# Altium PCB V3.2_Board.PcbDoc (part 8 of 9)
Units mil, origin at the board's own origin, x right, y up, seen from the top; angles counter-clockwise.
Board outline 7795.28 x 4881.89 mil, 2 copper layers (Top Layer, Bottom Layer), stack 57 mil thick; 419 components, 273 nets, 1244 pads, 414 vias.
Unrouted connection lines stored in the file: 3.
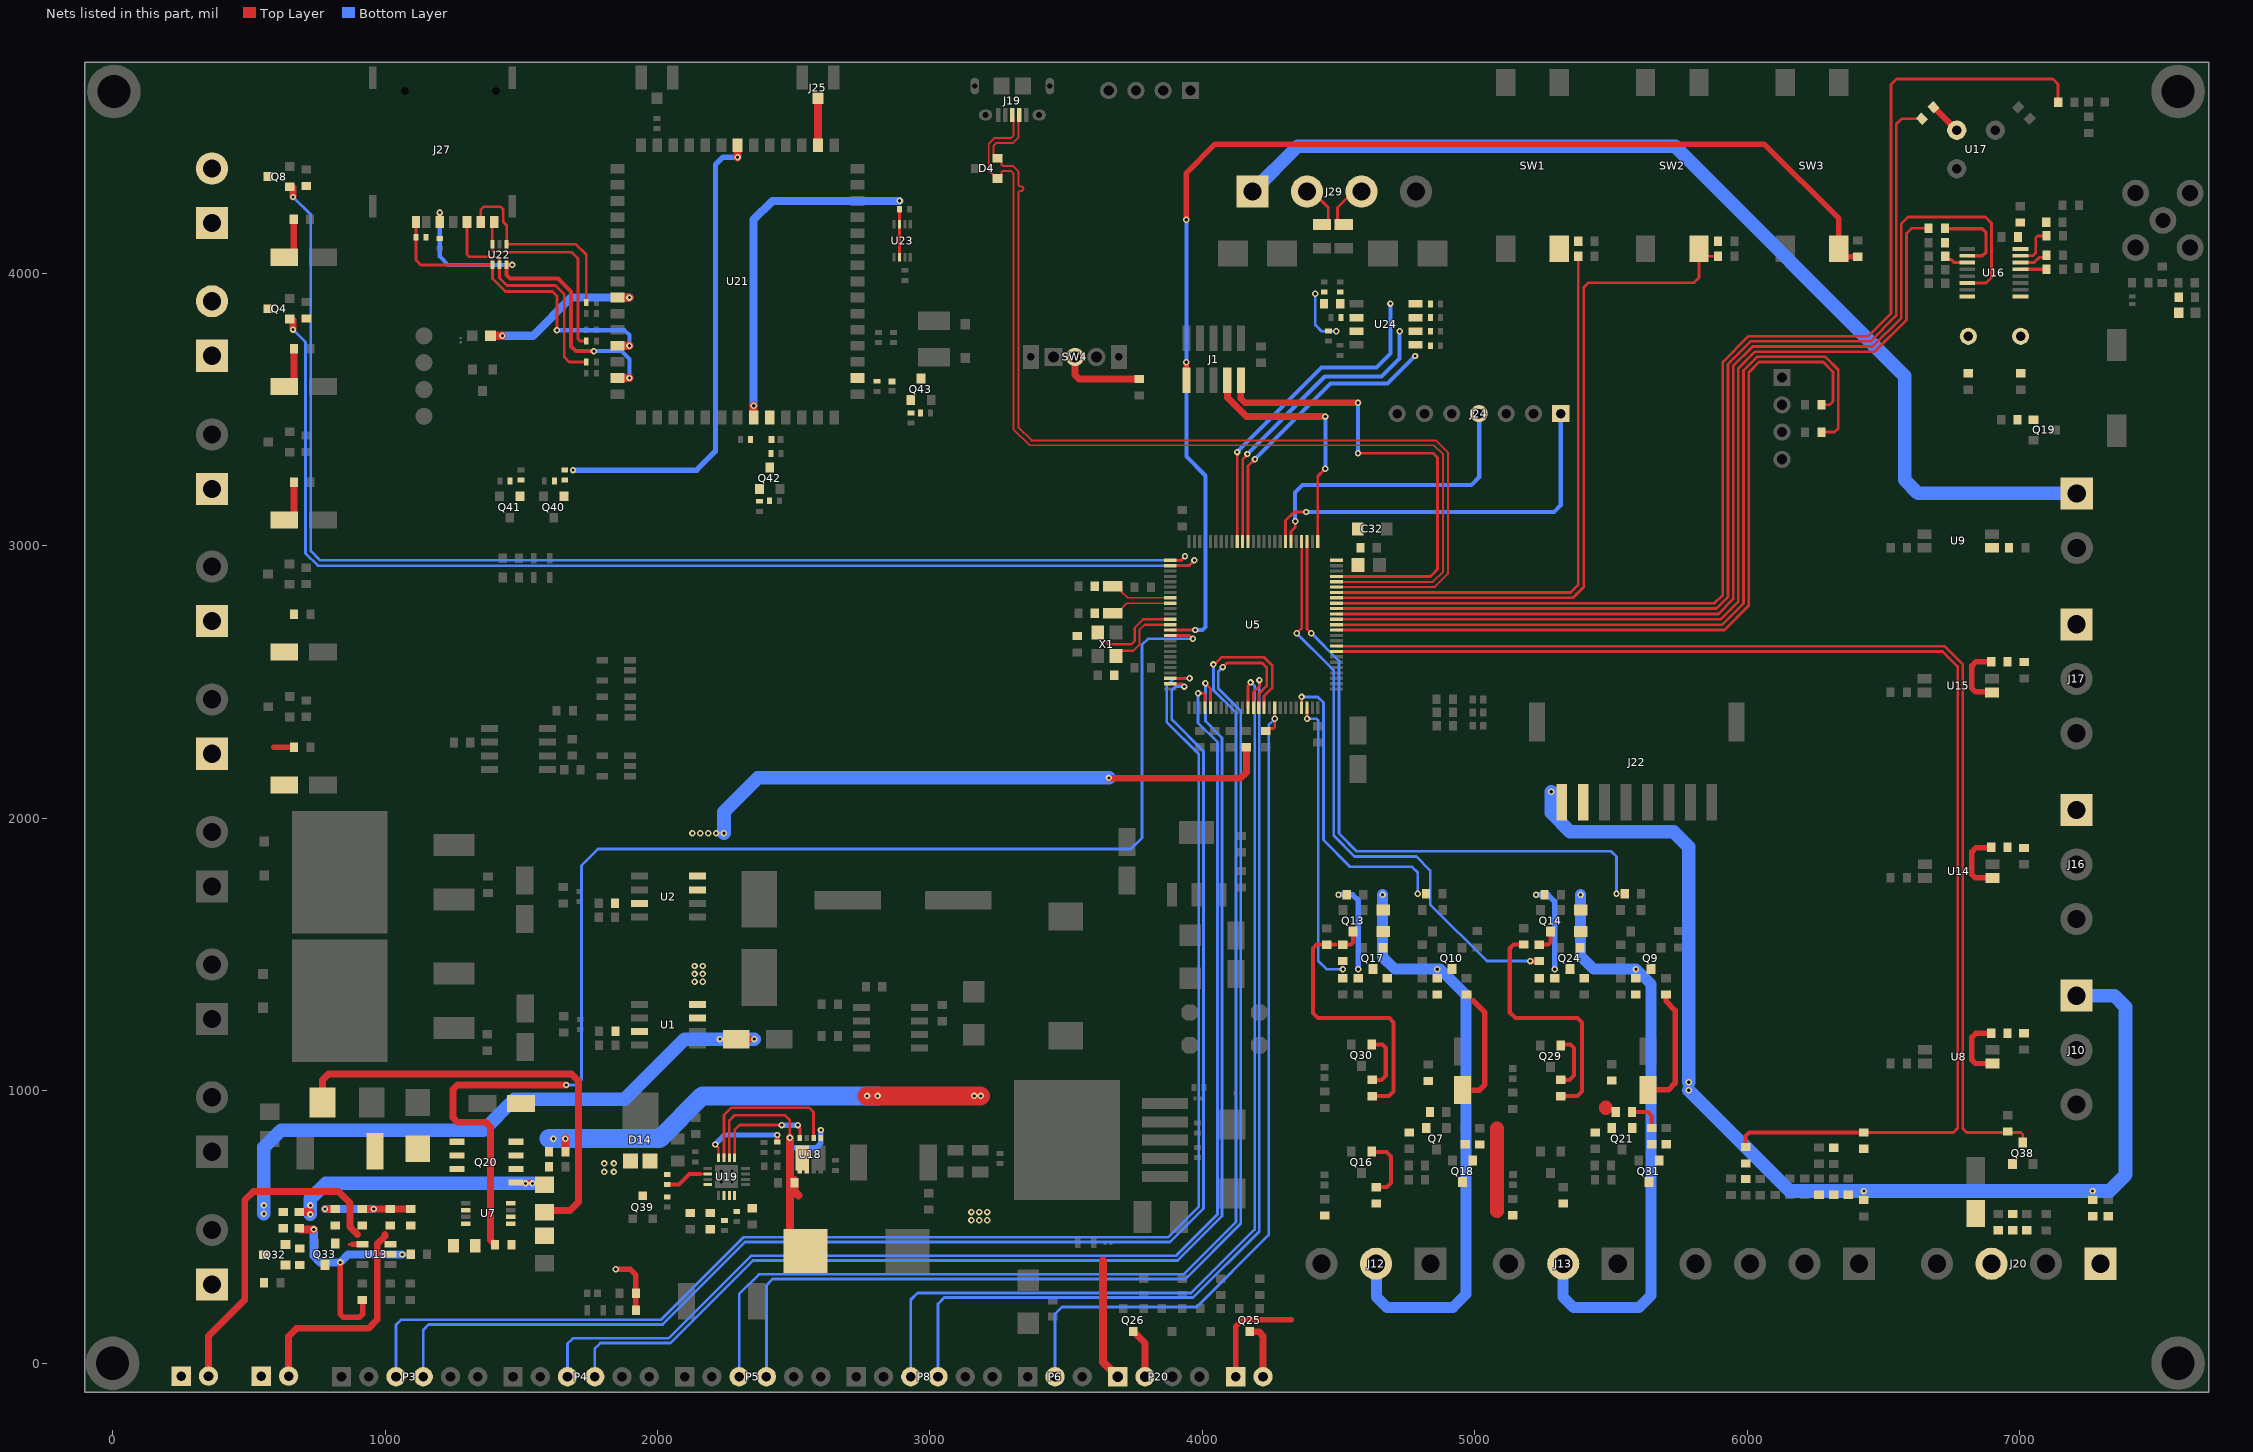
[diagram p4: the nets of this part, all layers, seen from the top]

## Via types
v1: diameter 23.62, hole 11.81, Top Layer to Bottom Layer, 414 vias

## Nets (pads, with @x,y where several pads share a name; then routed paths per layer and width w, separated by ;. In a path a pad name is that pad's centre, name@x,y a point inside that pad or via, vN(x,y) a via of type N, cw(c..) or ccw(c..) an arc to the next point about the centre after c; other vN are vias at no path point) (continued)
NetQ16_1: Q16.1 R90.2 | length 236.9
  Top Layer w15: Q16.1@4621.4,775.59 4675.96,775.59 4692.61,758.94 4692.61,660.9 4677.71,646 R90.2@4638,646
NetQ17_1: Q17.1 R95.1 R97.1
NetQ17_3: Q17.3 R52.2 R86.2 | length 333.1
  Bottom Layer w20: v1(4499.46,1719) 4551,1719 4572,1698 v1(4572,1446.15)
NetQ18_1: Q18.1 R28.2
NetQ18_3: Q18.3 R29.2
NetQ19_1: Q19.1 R62.1
NetQ21_1: Q21.1 R68.1 R107.1 | length 120.8
  Top Layer w15: R68.1@5578.77,922 5635,922 5649,908 R107.1@5649,863.27
NetQ24_1: Q24.1 R96.1 R98.1
NetQ24_3: Q24.3 R56.2 R88.2 | length 327.7
  Bottom Layer w20: v1(5224.2,1719) 5269.13,1719 5293,1695.13 v1(5293,1446.15)
NetQ29_1: Q29.1 R99.2 | length 213.5
  Top Layer w15: Q29.1@5312.4,1169.59 5351.44,1169.59 5364,1157.03 5364,1056 5348,1040 R99.2@5315,1040
NetQ30_1: Q30.1 R100.2 | length 213.5
  Top Layer w15: Q30.1@4621.4,1169.59 4660.44,1169.59 4673,1157.03 4673,1056 4657,1040 R100.2@4624,1040
NetQ31_1: Q31.1 R33.2
NetQ31_3: Q31.3 R107.2
NetQ32_1: Q32.1 Q33.3 R71.2
NetQ33_1: Q33.1 R81.2
NetQ38_1: Q38.1 R22.1
NetQ39_3: Q39.3 R123.1 R125.2 U19.2 | length 165.1
  Top Layer w8: 2157.75,694.7 U19.2@2184.81,694.7
  Top Layer w15: R123.1@2036,655.5 2079,655.5 2118.2,694.7 2157.75,694.7
NetQ40_1: Q40.1 R138.2 R139.2
NetQ41_1: Q41.1 R141.2 R142.2
NetQ42_1: Q42.1 R143.1 R145.2
NetQ43_1: Q43.1 R146.1 R147.2
NetR5_1: R5.1 U1.7
NetR8_1: R8.1 U2.7
NetR16_1: R16.1 SW4.2 | length 309.2
  Top Layer w25: SW4.2@3532.26,3693 3532.26,3626.64 3546.9,3612 R16.1@3769,3612
NetR37_1: R37.1 U14.1 | length 240.8
  Top Layer w20: R37.1@6894.97,1891.79 6839,1891.79 6824,1876.79 6824,1794 6837.11,1780.89 U14.1@6899.38,1780.89
NetR39_1: R39.1 U15.1 | length 240.8
  Top Layer w20: R39.1@6895.18,2574.45 6839.21,2574.45 6824.21,2559.45 6824.21,2476.67 6837.32,2463.56 U15.1@6899.59,2463.56
NetR61_1: R61.1 R63.1 R108.1 U24.7 | length 200.5
  Bottom Layer w10: v1(4414.31,3925) 4414.31,3810.69 4437.52,3787.48 v1(4490.9,3787.48)
NetR78_1: R78.1 U8.1 | length 240.8
  Top Layer w20: R78.1@6894.97,1210.79 6839,1210.79 6824,1195.79 6824,1113 6837.11,1099.89 U8.1@6899.38,1099.89
NetR80_1: R80.1 U9.1
NetR87_1: R87.1 R106.2 R108.2 U24.6
NetR111_1: R111.1 SB37.1
NetR112_2: R112.2 R113.2 R114.2
NetR115_1: R115.1 SB38.1
NetR116_1: R116.1 U17.2 | length 120.4
  Top Layer w22: R116.1@6683.19,4609.59 6683.82,4609.59 6768.05,4525.36 U17.2@6768.69,4525.36
NetR121_1: R121.1 U19.16 | length 322.8
  Top Layer w7: R121.1@2439.57,811.45 R121.1@2439.88,811.14
  Top Layer w8: v1(2211.65,802.64) 2211.65,802.55 2224.06,790.14 U19.16@2224.06,753.89
  Top Layer w15: R121.1@2439.57,811.45 v1(2439.57,837.51)
  Bottom Layer w20: v1(2211.65,802.64) 2246.52,837.51 v1(2439.57,837.51)
NetR122_1: R122.1 R124.1 U19.4
NetR127_1: R127.1 R129.2 U19.8
NetSB7_1: SB7.1 U7.5 | length 3.2
  Top Layer w10: SB7.1@1461.88,437.59 SB7.1@1464.11,435.36
NetSB17_2: SB17.2 U16.5 | length 95.8
  Top Layer w12: U16.5@7002.44,4014.5 U16.5@7002.44,4014.5 7098.15,4014.56 SB17.2@7098.21,4014.61
NetSB18_1: SB18.1 U16.10 | length 302.8
  Top Layer w12: SB18.1@6725,4164 6861.68,4164 6876,4149.68 6876,4077.67 6862.83,4064.5 U16.10@6807.56,4064.5
NetU18_2: U18.2 U19.15 | length 598.7
  Top Layer w10: U19.15@2243.93,753.69 2244.11,753.87 2244.11,910.61 2271.5,938 2556.19,938 2572.88,921.31 U18.2@2572.88,826.64
NetU18_4: U18.4 U19.13 | length 391.7
  Top Layer w10: U19.13@2283.3,753.69 2283.3,855.73 2301.57,874 v1(2456,874) ; v1(2514.82,874) 2514.82,870.31 2522.7,862.44 U18.4@2522.7,826.64
  Bottom Layer w20: v1(2456,874) v1(2514.82,874)
NRST: C73.2 J1.10 SW3.3 U5.14 | length 4639.2
  Top Layer w10: U5.14@3881.86,2690.84 3881.94,2690.92 3973.74,2690.92 v1(3973.88,2691.05) ; SW3.3@6335.54,4090.4 SW3.3@6364.94,4061
  Top Layer w20: J1.10@3941,3608 v1(3941,3674) ; v1(3941,4197) 3941,4368 4047,4474 6061.92,4474 6335.54,4200.38 SW3.3@6335.54,4090.4 ; SW3.3@6364.94,4061 C73.2@6405,4061
  Bottom Layer w15: v1(3941,4197) v1(3941,3674) 3941,3328 4012,3257 4012,2702.72 4000.28,2691 v1(3973.88,2691.05)
  Bottom Layer w20: v1(3973.88,2691.05) v1(3973.88,2691.05)
OSC_IN: C53.2 U5.8 X3.1 | length 255.5
  Top Layer w7: X3.1@3648.22,2851.06 X3.1@3671,2851.06 X3.1@3686.75,2851.06 ; X3.1@3683.97,2851.06 X3.1@3686.75,2851.06 ; U5.8@3881.86,2808.95 3881.55,2809.26 3725.78,2809.26 3702.93,2832.1 3702.93,2834.88 X3.1@3686.75,2851.06
OSC_OUT: C78.2 U5.9 X3.2 | length 245.2
  Top Layer w7: X3.2@3648.22,2752.64 X3.2@3671,2752.64 X3.2@3686.75,2752.64 ; X3.2@3686.56,2752.64 X3.2@3686.75,2752.64 ; U5.9@3877.98,2789.26 3723.19,2789.26 3702.93,2769.01 3702.93,2768.82 X3.2@3686.75,2752.64
OV_UV_EN: R81.1 R82.2 R117.1 R118.1 | length 394.9
  Top Layer w25: v1(779.77,565.93) R81.1@818.18,565.93 ; R117.1@916.95,565.93 v1(959,565.93) R118.1@1019.31,565.93 R82.2@1094.27,565.93
  Bottom Layer w30: v1(779.77,565.93) v1(959,565.93)
PATCH: C77.1 L4.1
PH: C82.2 L5.1 U18.1 U18.5 U19.14 | length 1067.2
  Top Layer w10: U19.14@2263.62,753.69 2263.62,891.41 2281.79,909.59 2468.04,909.59 2485.96,891.67 v1(2485.96,827.27)
  Top Layer w30: L5.1@2485.96,462 v1(2485.96,827.27) ; C82.2@2502.88,672.32 C82.2@2502.88,662.64 2502.88,630.63 2518.08,615.42
  Bottom Layer w20: v1@2485.91,827.22 2485.91,801.53 2497.44,790 2581.32,790 2599.69,808.37 v1(2599.69,855.83)
PIR_OUT: R116.2 U5.66 | length 3805.8
  Top Layer w10: U5.66@4492.1,2769.58 5886.63,2769.58 5929,2811.95 5929,3667.42 6011.99,3750.41 6451.85,3750.41 6546.11,3844.68 6546.11,4547.11 6566.16,4567.16 R116.2@6640.76,4567.16
PM_CNTRL: Q4.1 R6.1 U5.2 | length 4261.8
  Top Layer w10: U5.2@3881.86,2927.06 3950.5,2927.06 v1(3970.44,2947)
  Top Layer w25: v1(662.32,3793.61) Q4.1@662.32,3829.13
  Bottom Layer w10: v1@662.32,3793.31 707.98,3747.65 707.98,2972.36 753.34,2927 3950.44,2927 v1(3970.44,2947)
PROP_MIXING: J8.2 Q4.3
PS_MCU: SB37.2 SB38.2 U5.58 | length 4828
  Top Layer w10: U5.58@4492.1,2612.09 6716.69,2612.09 6772,2556.79 6772,862.43 6756.57,847 SB38.2@6428,847
  Top Layer w15: SB37.2@5993.87,793 5993.87,833.93 6006.94,847 SB38.2@6428,847
PS_PWR: J20.1 SB43.2 SB44.2
PSW_MCU: C40.1 D12.1 J20.3 R22.2 R66.2
PWM_D2: Q38.3 R20.1 U5.59 | length 4279.5
  Top Layer w10: U5.59@4501,2631.78 6723.88,2631.78 6791,2564.66 6791,860.54 6804.54,847 7003,847 7011,839 Q38.3@7011,810.37
PWRKEY: C102.2 D19.1 Q43.3 U21.30
R_GND: P20.2 Q26.3 | length 183.2
  Top Layer w25: Q26.3@3746.83,116.21 3789.25,73.79 P20.2@3789.25,-49.47
RE/DE/RS485/T: R58.1 R59.1 U5.90 U24.2 U24.3 | length 1132
  Top Layer w10: U5.90@4147.61,3015.64 4147.61,3316.47 4165,3333.87 v1(4165,3337)
  Bottom Layer w15: v1(4165,3337) 4449,3621 4657,3621 4724,3688 v1(4724,3787)
RESIN_SAVER: J9.2 Q8.3
RF_ANT: J25.1 U21.45 | length 173.5
  Top Layer w30: U21.45@2589.2,4470.13 2589.2,4638.1 J25.1@2593.11,4642.01
RF_DO: SB18.2 U5.64 | length 3454.5
  Top Layer w10: U5.64@4492.1,2730.21 5901,2730.21 5967,2796.21 5967,3651.68 6027.73,3712.41 6467.59,3712.41 6584.11,3828.94 6584.11,4146.78 6602.33,4165 SB18.2@6665,4165
RF_RSSI: U5.65 U16.14 | length 4016
  Top Layer w10: U5.65@4492.1,2749.89 5893.81,2749.89 5948,2804.08 5948,3659.55 6019.86,3731.41 6459.72,3731.41 6565.11,3836.81 6565.11,4182.11 6589.32,4206.32 6873.55,4206.32 6896,4183.87 6896,3984.36 6876.14,3964.5 U16.14@6807.56,3964.5
RO1: C71.2 U16.1 X2.1 | length 0.9
  Top Layer w12: U16.1@7002.44,3914.5 U16.1@7003.06,3913.88
RO2: C72.2 U16.16 X2.2 | length 3.7
  Top Layer w12: U16.16@6807.56,3914.5 6810.05,3914.5 U16.16@6810.94,3913.61
RS485/RS232/T.RXD/RS485/RS232/T: R57.1 U5.89 U24.1 | length 1057.4
  Top Layer w10: U5.89@4167.29,3015.64 4167.29,3292.47 v1(4192.54,3317.72)
  Bottom Layer w15: v1(4192.54,3317.72) 4469.83,3595 4679,3595 v1(4780.5,3696.5)
RS485/RS232/T.TXD/RS485/RS232/T: R60.1 U5.91 U24.4 | length 1224.4
  Top Layer w10: v1(4127.31,3343.73) 4127.46,3343.58 4127.46,3016.1 U5.91@4127.92,3015.64
  Bottom Layer w15: v1(4127.31,3343.73) 4127.31,3344.04 4437.27,3654 4638.21,3654 4690,3705.79 v1(4690,3889)
RS485_N: F2.2 J29.2 | length 178.7
  Top Layer w10: J29.2@4384,4300 4402.81,4300 4461.86,4240.94 4461.86,4240.21 4461.86,4193.5 4447.18,4178.82 F2.2@4439.06,4178.82
RS485_P: F3.2 J29.3 | length 188.9
  Top Layer w10: F3.2@4518.67,4178.82 4510.55,4178.82 4495.86,4193.5 4495.86,4226.13 4495.86,4240.94 4554.92,4300 J29.3@4584,4300
RS_CNTRL: Q8.1 R9.1 U5.1 | length 4652.2
  Top Layer w10: U5.1@3881.86,2946.74 3923.33,2946.74 3936,2959.41 v1(3936,2962)
  Top Layer w25: v1(662.32,4280.07) Q8.1@662.32,4315.59
  Bottom Layer w10: v1@662.52,4280.07 727.73,4214.87 727.73,2981.3 762.3,2946.73 3920.73,2946.73 v1(3936,2962)
RST_GSM: C100.2 D16.1 Q42.3 U21.24
RX_D1: SB19.1 U5.62 | length 2902.2
  Top Layer w10: U5.62@4492.1,2690.84 5915.37,2690.84 6005,2780.47 6005,3635.94 6043.47,3674.41 6278.51,3674.41 6314.63,3638.29 6314.63,3529.86 6302.14,3517.36 SB19.1@6272.11,3517.36
RX_D2: SB20.1 U5.63 | length 3051.8
  Top Layer w10: U5.63@4492.1,2710.52 5908.18,2710.52 5986,2788.34 5986,3643.81 6035.6,3693.41 6286.38,3693.41 6333.63,3646.16 6333.63,3430.8 6320.19,3417.36 SB20.1@6272.11,3417.36
RXIN1: R91.2 R101.1 U5.48 | length 1070
  Top Layer w10: U5.48@4383.83,2405.4 4383.91,2405.32 4383.91,2365.09 v1(4384,2365)
  Bottom Layer w10: v1(4384,2365) 4419.14,2365 4425,2359.14 4425,1476 4454.85,1446.15 v1(4515.6,1446.15)
RXIN1#: Q13.3 R48.1 R100.1 R101.2 | length 1061.7
  Top Layer w15: R48.1@4450.53,1536.28 4488,1536.28 ; R48.1@4457,1536 4419.53,1536 4406,1522.47 4406,1285.11 4424.11,1267 4686,1267 4702,1251 4702,997 4685,980 R100.1@4624,980 ; R101.2@4515.6,1536 4545,1536 4553,1544 Q13.3@4553,1584.39
RXIN2: R92.2 R102.1 U5.79 | length 2161.1
  Top Layer w10: v1(4346,2679) 4364.14,2697.14 U5.79@4364.14,3015.64
  Top Layer w20: v1(5203.35,1476) R102.1@5236,1476
  Bottom Layer w10: v1(4346,2679) 4461,2564 4482,2543 4482,1936.26 4558.41,1859.85 4785.12,1859.85 4836,1808.97 4836,1684 5044,1476 v1(5203.35,1476)
RXIN2#: Q14.3 R49.1 R99.1 R102.2 | length 992
  Top Layer w15: R49.1@5179,1536.28 5141.53,1536.28 5128,1522.75 5128,1287.78 5148.78,1267 5377,1267 5393,1251 5393,997 5376,980 R99.1@5315,980 ; R102.2@5240.34,1536 5269.74,1536 5277.74,1544 Q14.3@5277.74,1584.39
S_VIN: D14.1 D14.2 J21.1 R123.2 R126.2 R128.2 | length 212.6
  Top Layer w20: v1(1847,345) 1847.21,345.21 1899.36,345.21 1921,323.57 R128.2@1921,257 R126.2@1921,194
  other v1: 1805,702.08 1840,702.08 1805,733.08 1840,733.08
SCK_NFC: J24.1 U5.82 | length 1446
  Top Layer w10: U5.82@4305.09,3015.64 4305.09,3092.09 4337,3124 v1(4381,3124)
  Bottom Layer w15: v1(4381,3124) 5290.15,3124 5315,3148.85 J24.1@5315,3485
SEL0: R104.1 SB42.1 U16.7 | length 158.9
  Top Layer w10: U16.7@7002.44,4064.5 7048.73,4064.5 7058.15,4073.91 7058.15,4130.19 7065.18,4137.22 SB42.1@7098.21,4137.22
SEL1: R55.1 SB41.1 U16.11 | length 100.2
  Top Layer w12: R55.1@6726,4051.98 6735,4051.98 6726,4060.98 R55.1@6726,4062 ; R55.1@6735,4050.98 6735,4050.79 6748.75,4050.79 6760.05,4039.5 U16.11@6807.56,4039.5
SHDN: R64.2 SB7.2 U5.15 | length 5060.7
  Top Layer w10: U5.15@3881.86,2671.15 3952.45,2671.15 3965.01,2658.59 v1(3965.12,2658.59)
  Top Layer w25: SB7.2@1404.11,435.36 1403,435.36 1387,451.36 1387,867 1370,884 1265.99,884 1249,900.99 1249,1004 1266,1021 v1(1665,1021)
  Bottom Layer w10: v1(1665,1021) 1702,1021 1721,1040 1721,1827.04 1780.96,1887 3737.06,1887 3778.26,1928.21 3778.26,2637.13 3799.73,2658.59 v1(3965.12,2658.59)
SHDN#: C75.1 R105.2 U16.8
SIM_CD: J27.CD R144.2 U21.12 U22.4 | length 1219.3
  Top Layer w10: J27.CD@1113.66,4182.87 1113.66,4048.34 1131.19,4030.81 U22.4@1394.41,4030.81 1394.41,3980.31 1441.64,3933.07 1614.14,3933.07 1631,3916.21 v1(1631,3791) ; U21.12@1852.98,3733.91 U21.12@1854.07,3735
  Top Layer w30: U21.12@1852.98,3733.91 v1(1896.86,3733.91)
  Bottom Layer w15: v1(1631,3791) 1879,3791 1896.86,3773.14 v1(1896.86,3733.91)
SIM_CLK: J27.C3 R135.1 U22.3 | length 758.1
  Top Layer w7: U22.3@1394.41,4107.19 1394.35,4107.13 1394.35,4082.3 1399.09,4077.56 1459.08,4077.56
  Top Layer w10: J27.C3@1393.19,4174.99 1393.19,4108.41 U22.3@1394.41,4107.19 ; J27.C3@1393.19,4179.99 J27.C3@1401.06,4187.87 ; 1459.08,4077.56 1684.44,4077.56 1708,4054 1708,3759.57 1715.94,3751.63 R135.1@1738.61,3751.63
SIM_DATA: J27.C7 R134.1 U22.1 | length 748.2
  Top Layer w10: J27.C7@1351.06,4187.87 1351.06,4231.64 1364,4244.57 1423.43,4244.57 1434,4234 1434,4188.26 1446.81,4175.45 ; 1446.81,4170.45 1446.81,4108.41 U22.1@1445.59,4107.19 1699.81,4107.19 1738.61,4068.39 R134.1@1738.61,3893.36
SIM_RST: J27.C2 R136.1 U22.5 | length 892.2
  Top Layer w7: 1377.14,4060.56 1415.31,4060.56 1420,4055.87 U22.5@1420,4030.81
  Top Layer w10: J27.C2@1301.06,4182.87 1301.06,4069 1309.5,4060.56 1377.14,4060.56 ; U22.5@1420,4030.81 1420,3983 1448,3955 1625.72,3955 1658,3922.72 1658,3692.58 1675.72,3674.86 R136.1@1738.61,3674.86
SIM_VDD: C101.1 J27.C1 R144.1 U21.14 U22.6 | length 1343.2
  Top Layer w10: J27.C1@1201,4187.93 J27.C1@1201.06,4187.87
  Top Layer w15: U22.6@1445.59,4025.06 1445.59,3993.79 1459.08,3980.31 1635.76,3980.31 1683,3933.07 1683,3732 1700.8,3714.2 v1(1766.61,3714.2) ; U22.6@1445.59,4030.81 v1(1466.81,4030.81)
  Top Layer w20: J27.C1@1201,4187.93 v1(1201,4223) ; U21.14@1852.98,3615.8 U21.14@1853.09,3615.91
  Top Layer w30: U21.14@1853.09,3615.91 v1(1896.97,3615.91)
  Bottom Layer w15: v1@1201,4228 1201,4061 1231.19,4030.81 v1(1466.81,4030.81) ; v1(1766.61,3714.2) 1867.8,3714.2 1896.97,3685.03 v1(1896.97,3615.91)
SNS_IN: SB3.2 U5.67 | length 4512.8
  Top Layer w10: U5.67@4492.1,2789.26 5879.44,2789.26 5910,2819.82 5910,3675.29 6004.12,3769.41 6443.98,3769.41 6527.11,3852.55 6527.11,4693.12 6546.99,4713 7122,4713 7140,4695 7140,4635 SB3.2@7145,4630
SPI_NFC.SS_NFC: J24.4 U5.81 | length 1119.8
  Top Layer w10: U5.81@4324.77,3015.64 4324.77,3052.77 4340.96,3068.96 v1(4340.96,3090.04)
  Bottom Layer w15: v1(4340.96,3090.04) 4339.72,3091.28 4339.72,3194.95 4367.56,3222.79 4986.73,3222.79 5016,3252.06 5016,3484 J24.4@5015,3485
SQ: SB6.1 U16.6 | length 106.6
  Top Layer w10: U16.6@7002.44,4039.5 7052.7,4039.5 7072.14,4058.94 7091.53,4058.94 SB6.1@7098.21,4065.61
STATUS: R138.1 U21.50 | length 1739.4
  Top Layer w30: v1(2293.92,4426.25) U21.50@2293.92,4470.13
  Bottom Layer w20: v1(1690,3277.86) 2143.41,3277.86 2213,3347.45 2213,4398.83 2240.42,4426.25 v1(2293.92,4426.25)
SW_1: C37.2 R18.1 SW1.3 U5.69 | length 2104.6
  Top Layer w10: U5.69@4492.1,2828.63 5351.63,2828.63 5379.05,2856.05 C37.2@5379.05,4062.36
SW_2: C38.2 R19.1 SW2.3 U5.68 | length 2700.3
  Top Layer w10: U5.68@4492.1,2808.95 5359.37,2808.95 ; 5359.37,2809.26 5360.54,2809.26 5399.05,2847.77 5399.05,3947.05 5417.67,3965.67 5804.72,3965.67 5822.76,3983.7 SW2.3@5822.76,4062.36 ; SW2.3@5822.76,4090.4 SW2.3@5822.76,4065.79 ; C38.2@5892.41,4062.36 SW2.3@5847.36,4062.36 ; SW2.3@5822.76,4062.36 SW2.3@5847.36,4062.36 ; SW2.3@5822.76,4062.36 SW2.3@5822.76,4065.79 ; SW2.3@5822.76,4065.79 5847.36,4090.4 SW2.3@5847.36,4062.36
SWCLK: J1.4 U5.76 | length 921.2
  Top Layer w10: U5.76@4423.2,3015.64 4423.2,3255.2 v1@4450.54,3282.54
  Top Layer w25: J1.4@4091,3608 4091.81,3607.19 4091.81,3543.58 4161.22,3474.17 v1(4450.54,3474.17)
  Bottom Layer w15: v1(4451,3283) v1@4451,3473.71
SWDIO: J1.2 U5.72 | length 1779.3
  Top Layer w10: U5.72@4492.1,2887.69 4836.69,2887.69 4863,2914 4863,3323 4846,3340 v1(4571,3340)
  Top Layer w25: J1.2@4141,3608 4141,3539.64 4155.64,3525 v1(4571,3525)
  Bottom Layer w15: v1(4571,3340) v1(4571,3525)
TDS_1: P3.4 U5.24 | length 5276.6
  Top Layer w10: U5.24@3881.86,2493.98 3922.33,2493.98 v1(3933.02,2483.3)
  Bottom Layer w10: P3.4@1140.25,-49.47 1140.25,122.25 1160.31,142.31 2019.11,142.31 2321.79,445 3881.12,445 4004,567.88 4004,2245.84 3887.94,2361.91 3887.94,2470.39 3900.85,2483.3 v1(3933.02,2483.3)
TDS_2: P3.3 U5.23 | length 5444.1
  Top Layer w10: U5.23@3881.86,2513.67 3881.94,2513.74 3952.41,2513.74 v1(3952.75,2514.08)
  Bottom Layer w10: P3.3@1040.25,-49.47 1040.25,141.25 1058.31,159.31 2012.06,159.31 2314.75,462 3874.08,462 3987,574.92 3987,2235.01 3868.64,2353.37 3868.64,2486.25 3896.06,2513.67 3952.34,2513.67 v1(3952.75,2514.08)
TDS_3: P4.4 U5.30 | length 4684.9
  Top Layer w10: v1(4010.94,2495.2) 4029.5,2476.64 U5.30@4029.5,2405.4
  Bottom Layer w10: P4.4@1770,-49.47 1770,54 1790.31,74.31 2047.27,74.31 2349.96,377 3909.29,377 4072,539.71 4072,2295.14 4010.94,2356.2 v1(4010.94,2495.2)
TDS_4: P4.3 U5.29 | length 4720.6
  Top Layer w10: v1(3984.13,2459) 4003.96,2459 4009.81,2453.14 U5.29@4009.81,2405.4
  Bottom Layer w10: P4.3@1670,-49.47 1670,72 1689.31,91.31 2040.23,91.31 2342.92,394 3902.25,394 4055,546.75 4055,2279.37 3984.13,2350.24 v1(3984.13,2459)
TDS_5: P5.4 U5.39 | length 4588.1
  Top Layer w10: v1(4074.62,2554.85) 4089.59,2569.82 4219.52,2569.82 4235.97,2553.36 4235.97,2484.89 4206.66,2455.58 U5.39@4206.66,2405.4
  Bottom Layer w10: P5.4@2399.75,-49.47 2399.75,286.23 2422.52,309 3937.46,309 4140.35,511.9 4140.35,2394.69 4058.06,2476.98 4058.06,2538.29 v1(4074.62,2554.85)
TDS_6: P5.3 U5.40 | length 4723
  Top Layer w10: v1(4040.54,2564.46) 4043.46,2564.46 4069.59,2590.59 4226.9,2590.59 4255.81,2561.68 4255.81,2477.86 4226.35,2448.4 U5.40@4226.35,2405.4
  Bottom Layer w10: P5.3@2299.75,-49.47 2299.75,253.75 2372,326 3930.42,326 4123.35,518.94 4123.35,2387.65 4041.06,2469.94 4041.06,2563.94 v1(4040.54,2564.46)
TDS_7: P8.4 U5.38 | length 3691.9
  Top Layer w10: U5.38@4186.98,2405.4 4186.98,2462.77 4210.19,2485.98 4210.19,2506.13 v1(4209.16,2507.16)
  Bottom Layer w10: P8.4@3029.5,-49.47 3029.5,217.98 3052.52,241 3965.62,241 4209,484.38 4209,2507 v1(4209.16,2507.16)
TDS_8: P8.3 U5.37 | length 3763.1
  Top Layer w10: U5.37@4167.29,2405.4 4167.29,2485.89 4176.66,2495.26 v1(4176.66,2498.56)
  Bottom Layer w10: P8.3@2929.5,-49.47 2929.5,232.94 2954.56,258 3958.58,258 4191.65,491.07 4191.65,2485.12 4178.21,2498.56 v1(4176.66,2498.56)
TDS_IN.TEMP_SNS: P6.2 R31.1 U5.42 | length 3150.3
  Top Layer w10: R31.1@4234.75,2320.85 R31.1@4232.25,2320.85 4240.97,2329.56 4259.81,2329.56 4265.72,2335.47 U5.42@4265.72,2405.4
  Bottom Layer w10: P6.2@3459.25,-49.47 3459.25,181.19 3484.67,206.61 3979.32,206.61 4243,470.29 4243,2342.37 v1(4265.72,2365.09)
TXIN1: R47.2 U5.47 | length 1106.7
  Top Layer w7: v1(4364,2445.46) v1@4364.07,2445.39 ; U5.47@4364.07,2405.47 U5.47@4364.14,2405.4
  Top Layer w10: U5.47@4364.07,2405.47 v1@4364.07,2445.39
  Bottom Layer w10: v1(4364,2445.46) 4423.36,2445.46 4444,2424.82 4444,1920.52 4542.67,1821.85 4769.38,1821.85 4790.19,1801.04 v1(4790.19,1723)
TXIN2: R46.2 U5.78 | length 2310.1
  Top Layer w10: U5.78@4383.83,3015.64 4383.83,2694.76 v1(4399.59,2679)
  Bottom Layer w10: v1(4399.59,2679) 4501,2577.59 4501,1944.13 4566.28,1878.85 5499.99,1878.85 5519.83,1859.02 v1(5519.83,1723)
USB_D_N: D4.2 J19.2 U5.70 | length 3794.2
  Top Layer w7: J19.2@3328.11,4581.04 3324.32,4577.24 3324.32,4498.07 3304.24,4478 3243.07,4478 3233.78,4468.71 3233.78,4435.24 3246.42,4422.6 3250.35,4422.6 3263,4409.96 3263,4398.3 3267.1,4394.2 3303.97,4394.2 3324.32,4373.86 3324.32,4331.14 3324.32,4327.64 ccw(c3332.82,4327.64) 3332.82,4319.14 3334.28,4319.14 cw(c3334.28,4310.64) 3334.28,4302.14 3332.82,4302.14 ccw(c3332.82,4293.64) 3324.32,4293.64 3324.32,4272.15 3324.32,3435.86 3373.13,3387.04 4857.25,3387.04 4901,3343.28 4901,2897 4853.16,2849.16 4492.94,2849.16 U5.70@4492.1,2848.32
USB_D_P: D4.1 J19.3 U5.71 | length 3794.5
  Top Layer w7: J19.3@3302.52,4581.04 3306.32,4577.24 3306.32,4505.53 3296.79,4496 3235.61,4496 3215.78,4476.16 3215.78,4378.44 3246.42,4347.8 3250.35,4347.8 3263,4360.44 3263,4372.1 3267.1,4376.2 3296.52,4376.2 3306.32,4366.4 3306.32,4288.94 3306.32,4198 3306.32,3428.4 3365.68,3369.04 4849.79,3369.04 4883,3335.83 4883,2904.46 4845.7,2867.16 4492.94,2867.16 U5.71@4492.1,2868
USB_VBUS: F1.1 U21.9 | length 611.7
  Top Layer w30: F1.1@1387.19,3770.58 v1(1431.07,3770.58) ; U21.9@1852.98,3911.08 v1(1896.86,3911.08)
  Bottom Layer w30: v1(1431.07,3770.58) 1542.62,3770.58 1683.12,3911.08 v1(1896.86,3911.08)
VCC: C24.1 C25.1 C43.1 C45.1 C46.1 C47.1 C58.1 C59.1 C61.1 C62.1 C63.1 C64.1 C65.1 C66.1 C67.1 C68.1 J5.1 J6.1 J7.1 J8.1 J9.1 J10.1 J11.1 J16.1 J17.1 J22.7 J22.8 J29.1 P19.1 P20.1 Q7.2 Q21.2 R12.1 R27.2 R36.2 R37.2 R38.2 R39.2 R40.2 R41.2 R50.2 R51.2 R68.2 R77.2 R78.2 SB2.1 SB5.1 SB8.1 SB40.2 SB44.1 U1.3 U1.4 U2.3 U2.4 | length 14387.3
  Top Layer w10: C24.1@630.13,3095.04 639.5,3095.04 C24.1@666,3121.53 ; C65.1@630.13,3585.04 639.5,3585.04 C65.1@666,3611.53 ; C67.1@630.13,4059.15 638.5,4059.15 C67.1@665,4085.64
  Top Layer w20: 590.74,2261 C62.1@666,2261 ; P19.1@4122.25,-49.47 4122.25,134.25 4148,160 4327,160 ; C58.1@4951.04,1002.13 C58.1@4955,1002.13 5016.33,1002.13 5037,1022.81 5037,1287.33 4999,1325.33 4994.2,1330.13 ; C43.1@5635.5,1003.13 5710.13,1003.13 5735.2,1028.2 5735.2,1294.76 5701.4,1328.56 C46.1@5701.4,1353
  Top Layer w25: C67.1@665,4085.64 C68.1@665,4199 ; C24.1@666,3121.53 C25.1@666,3233 ; C65.1@666,3611.53 C66.1@666,3722.36 ; v1(3657,2148) 3658,2147 4140,2147 4161.39,2168.39 R12.1@4161.39,2260.85
  Top Layer w30: SB40.2@1662,786 v1(1662,823.96) ; 3635,377 3635,4.79 P20.1@3689.25,-49.47
  Top Layer w50: 5080.95,557.89 5080.95,862.27 ; 5480.9,935.1 5480.9,939.03
  Top Layer w70: v1@2769.42,981.01 2807.93,981.01 v1(2808,980.94) v1@3162.28,980.94 ; v1(3162.36,981.01) v1(3186.19,981.01)
  Bottom Layer w50: v1(2244,1945) 2244,2024 2368,2148 v1(3657,2148) ; J29.1@4184,4300 4350,4466 5734.39,4466 6577,3623.39 6577,3242 6626.64,3192.36 J11.1@7209.11,3192.36 ; v1(5280,2096.93) 5280,2020 5350,1950 5730,1950 5785,1895 v1(5785,1031) ; v1(5785,1002.07) 6155.24,631.83 7266.82,631.83 v1(7267,632.02) 7329.02,632.02 7388,691 7388,1307.29 7346.26,1349.03 J10.1@7208.11,1349.03
  Bottom Layer w70: 1602,823.96 v1(1618,823.96) v1(1662,823.96) 2007.96,823.96 2164.94,980.94 v1(2769.42,980.94) v1(2808,980.94)
  other v1: 3152.14,525 3181.07,525 3210,525 3152.14,554.75 3181.07,554.75 3210,554.75 6427.89,631.65 2136.25,1400 2166,1400 2136.25,1428.93 2166,1428.93 2136.25,1457.86 2166,1457.86 2128.28,1945 2157.21,1945 2186.14,1945 2215.07,1945
VCC#12: D11.2 Q32.3 R34.1 SB39.2 | length 2250.2
  Top Layer w35: D11.2@2289.37,1189.36 D11.2@2331.69,1189.36
  Bottom Layer w50: v1(555.53,548.24) 555.53,792.18 618.72,855.36 1361.03,855.36 1474.18,968.51 1879.29,968.51 2100.14,1189.36 v1(2229,1189.36) v1(2355,1189.36)
  other v1: 555.53,579.24
VCC#M: D6.1 Q20.1 Q20.2 Q20.3 R64.1 R149.1 U7.2 U7.4
VCC#P: C1.1 C3.1 C56.2 Q20.5 Q20.6 Q20.7 Q20.8 SB9.1 SB40.1 U7.8 | length 950.8
  Top Layer w10: v1@1522,660 1532.19,670.19
  Top Layer w30: SB9.1@686,555 v1@726.23,555
  Bottom Layer w50: v1(726.23,546) v1(726.23,579.29) 726.23,604.02 782.21,660 v1(1516,660) v1(1541.19,660)
VCC_M: C69.1 Q32.2 R11.2 R71.1 R82.1 SB9.2 SB39.1 U13.5 | length 833.3
  Top Layer w10: SB9.2@686,495 SB9.2@690.07,490.93
  Top Layer w20: v1(835.68,370.05) 835.68,179.72 847.39,168 906.28,168 918,179.72 918,231.38 R11.2@916.95,232.43
  Top Layer w30: SB9.2@690.07,490.93 v1(738.54,490.93)
  Bottom Layer w30: v1(738.54,490.93) 738.54,393.49 761.97,370.05 v1(835.68,370.05) 864.62,399 v1(1063,399)
VDD_EXT: C99.1 C103.1 U21.23 U23.3 U23.6 | length 1467.5
  Top Layer w10: U23.6@2888.27,4058.34 U23.3@2888.27,4180.39 2888.36,4180.48 2888.36,4234.77 C103.1@2888.45,4234.86
  Top Layer w30: U21.23@2352.98,3470.13 v1(2352.98,3514.01)
  Bottom Layer w30: v1(2352.98,3514.01) 2352.98,4196.98 2422,4266 v1(2888.45,4266)
VDDA: C32.1 C33.1 L1.2 U5.75
VOUT_A: P27.1 P27.2 R117.2 U13.1 | length 1281.5
  Top Layer w10: 869,434.79 869,435.43
  Top Layer w20: 880.72,436.56 916.51,436.56 U13.1@916.95,437
  Top Layer w25: P27.2@352.25,-47.47 352.25,99.65 485,232.39 485,598 517,630 830,630 871.71,588.29 871.71,500.15 899,472.86
VOUT_B: P28.1 P28.2 R118.2 U13.6 | length 821.8
  Top Layer w25: P28.2@646.25,-47.47 646.25,98.8 675.45,128 939.88,128 971.38,159.5 971.38,437.17 1000.18,465.98 1000.18,472.86
VREF: C86.2 R122.2 U19.6 U19.7
VSS: C56.1 D7.1 R65.2 U7.6 | length 1627
  Top Layer w25: D7.1@770.45,956 770.45,1039.45 792,1061 1685,1061 1710.15,1035.85 1710.15,591.99 1679.16,561 1591.75,561 C56.1@1585.11,554.36
W_LED: P19.2 Q25.3 | length 205.5
  Top Layer w25: Q25.3@4173.24,116.21 4173.87,115.58 4207.14,115.58 4222.25,100.46 P19.2@4222.25,-49.47
WBUS1: J12.2 Q10.3 R41.1 R90.1 R95.2 | length 2176.9
  Bottom Layer w40: J12.2@4637.28,365 4639,363.28 4639,243 4677,205 4919,205 4967,253 4967,1351.53 4872.38,1446.15 4705.85,1446.15 4661.44,1490.55 v1(4661.44,1719.5)
  other v1: 4862.16,1446.15
WBUS2: J13.2 Q9.3 R40.1 R89.1 R96.2 | length 2147.6
  Bottom Layer w40: J13.2@5321.62,365 5323.34,363.28 5323.34,243 5361.34,205 5602,205 5646,249 5646,1391.15 v1(5591,1446.15) 5435.85,1446.15 5388,1494 v1(5388,1719.5)
XIN: C34.2 U5.12 X1.1 | length 353.1
  Top Layer w8: X1.1@3615.65,2681.67 3615.65,2676.98 3654.27,2638.36 3739.4,2638.36 3751.66,2650.63 3751.66,2698.77 3783.09,2730.21 U5.12@3881.86,2730.21
XOUT: C35.2 U5.13 X1.3 | length 279.9
  Top Layer w8: X1.3@3682.58,2595.05 3682.58,2597.02 3700.2,2614.65 3746,2614.65 3768.66,2637.31 3768.66,2691.31 3787.87,2710.52 U5.13@3881.86,2710.52
pads on no net: J1.6 J1.7 J1.8 J19.4 J22.3 J22.6 J27.C6 J27.MH SW1.2 SW1.4 SW2.2 SW2.4 SW3.2 SW3.4 SW4.MH1 SW4.MH2 U5.19 U5.73 U5.77 U5.80 U5.88 U7.3 U7.7 U10.1 U11.1 U12.1 U16.15 U21.2 U21.4 U21.5 U21.17 U21.18 U21.19 U21.20 U21.21 U21.25 U21.26 U21.27 U21.36 U21.37 U21.40 U21.41 U21.42 U21.48 U21.49 U21.51

## Polygon pours and split planes (outlines as drawn)
GND on Bottom Layer "Bottom_GND" (solid, remove dead copper, pour order 27): 5.27,4667.53 7580.92,4667.53 7580.92,0.24 7580.68,0 0,0 0,4662.26
VCC on Bottom Layer "VCC_L02_P023" (solid, remove dead copper, pour order 23): 2853,1487 3248.5,1091.5 3248.5,492 3113.5,492 3113.5,1045.18 2788.68,1370 2098.76,1370 2098.76,1487
AGND on Bottom Layer "AGND_L02_P016" (solid, remove dead copper, pour order 16): 2114.89,449 2114.89,563 2243.93,563 2243.93,504.49 2298.68,504.49 2298.68,734.89 1888,734.89 1888,449
CRNT_SNS.IP+_1 on Top Layer "CRNT_SNS.IP+_1_L01_P015" (solid, remove dead copper, pour order 15): 1358,1509.52 2075,1509.52 2075,1230.05 2178.13,1230.05 2178.13,1154.46 2004.78,1154.46 2004.78,1427 1358,1427
GND on Top Layer "GND_L01_P006" (solid, remove dead copper, pour order 6): 3459.93,4675 3458,4673.07 3458,4369.48 3343.98,4255.47 3343.98,3357.02 4339.79,3357.02 4429.11,3267.71 4429.11,3015.64 4436.13,3015.64 4623.13,2828.63 5339.68,2828.63 5379.97,2788.34 5932.26,2788.34 5932.26,3631.26 6032.41,3731.41 6432.85,3731.41 6546.11,3844.68 6527.11,3863.68 6527.11,4675 7580.92,4675 7580.92,0.24 7580.68,0 0,0 0,4662.26 12.74,4675
VCC on Top Layer "VCC_L01_P013" (solid, remove dead copper, pour order 13): 2213,2750 2269,2694 2267,2694 2267,1737.25 2115.14,1737.25 2115.14,2070 1941.17,2070 1941.17,2122.6 1859.38,2122.6 1857.41,2124.57 1857.41,2338.55 1857.82,2338.96 1778.78,2418 1004,2418 963,2377 963,2060 412.58,2060 412.58,2750
CRNT_SNS.IP+_2 on Top Layer "CRNT_SNS.IP+_2_L01_P028" (solid, remove dead copper, pour order 28): 1358,1993 2074,1993 2074,1700.05 2192.75,1700.05 2192.75,1588 2004.78,1588 2004.78,1914 1358,1914
VCC on Top Layer "VCC_L01_P010" (solid, remove dead copper, pour order 10): 4755.67,889 4755.67,821.84 4396.59,821.84 4396.59,134.39 7271.39,134.39 7422,285 7422,1131.9 7109,1131.9 7109,3331 7592.16,3331 7592.16,134.39 7451.77,-6 4297,-6 4296,76 4296,889
VCC on Top Layer "VCC_L01_P022" (solid, remove dead copper, pour order 22): 3300.74,363.47 3419.48,363.47 4327,363.47 4327,578 3240,578 3110,578 3110,363.47
VCC on Top Layer "VCC_L01_P026" (solid, remove dead copper, pour order 26): 5019.25,896.7 5019.81,897.27 5056.04,897.27 5056.04,860.66 5055.67,860.29 5055.35,787.96 5088.14,823.74 5441,823.74 5441,891.05 5106.45,891.05 5094.89,902.61 5094.89,1062.11 4965,1062.11 4965,950.95
VCC on Top Layer "VCC_L01_P009" (solid, remove dead copper, pour order 9): 0,2060 0,4297 459,4297 459,2060